# Altium PCB BYTE_SPIne.PcbDoc (part 3 of 3)
Units mm, origin at the board's own origin, x right, y up, seen from the top; angles counter-clockwise.
Board outline 108 x 73 mm, 4 copper layers (Top Layer, GND, PWR, Bottom Layer), stack 1.586 mm thick; 173 components, 126 nets, 724 pads, 308 vias.
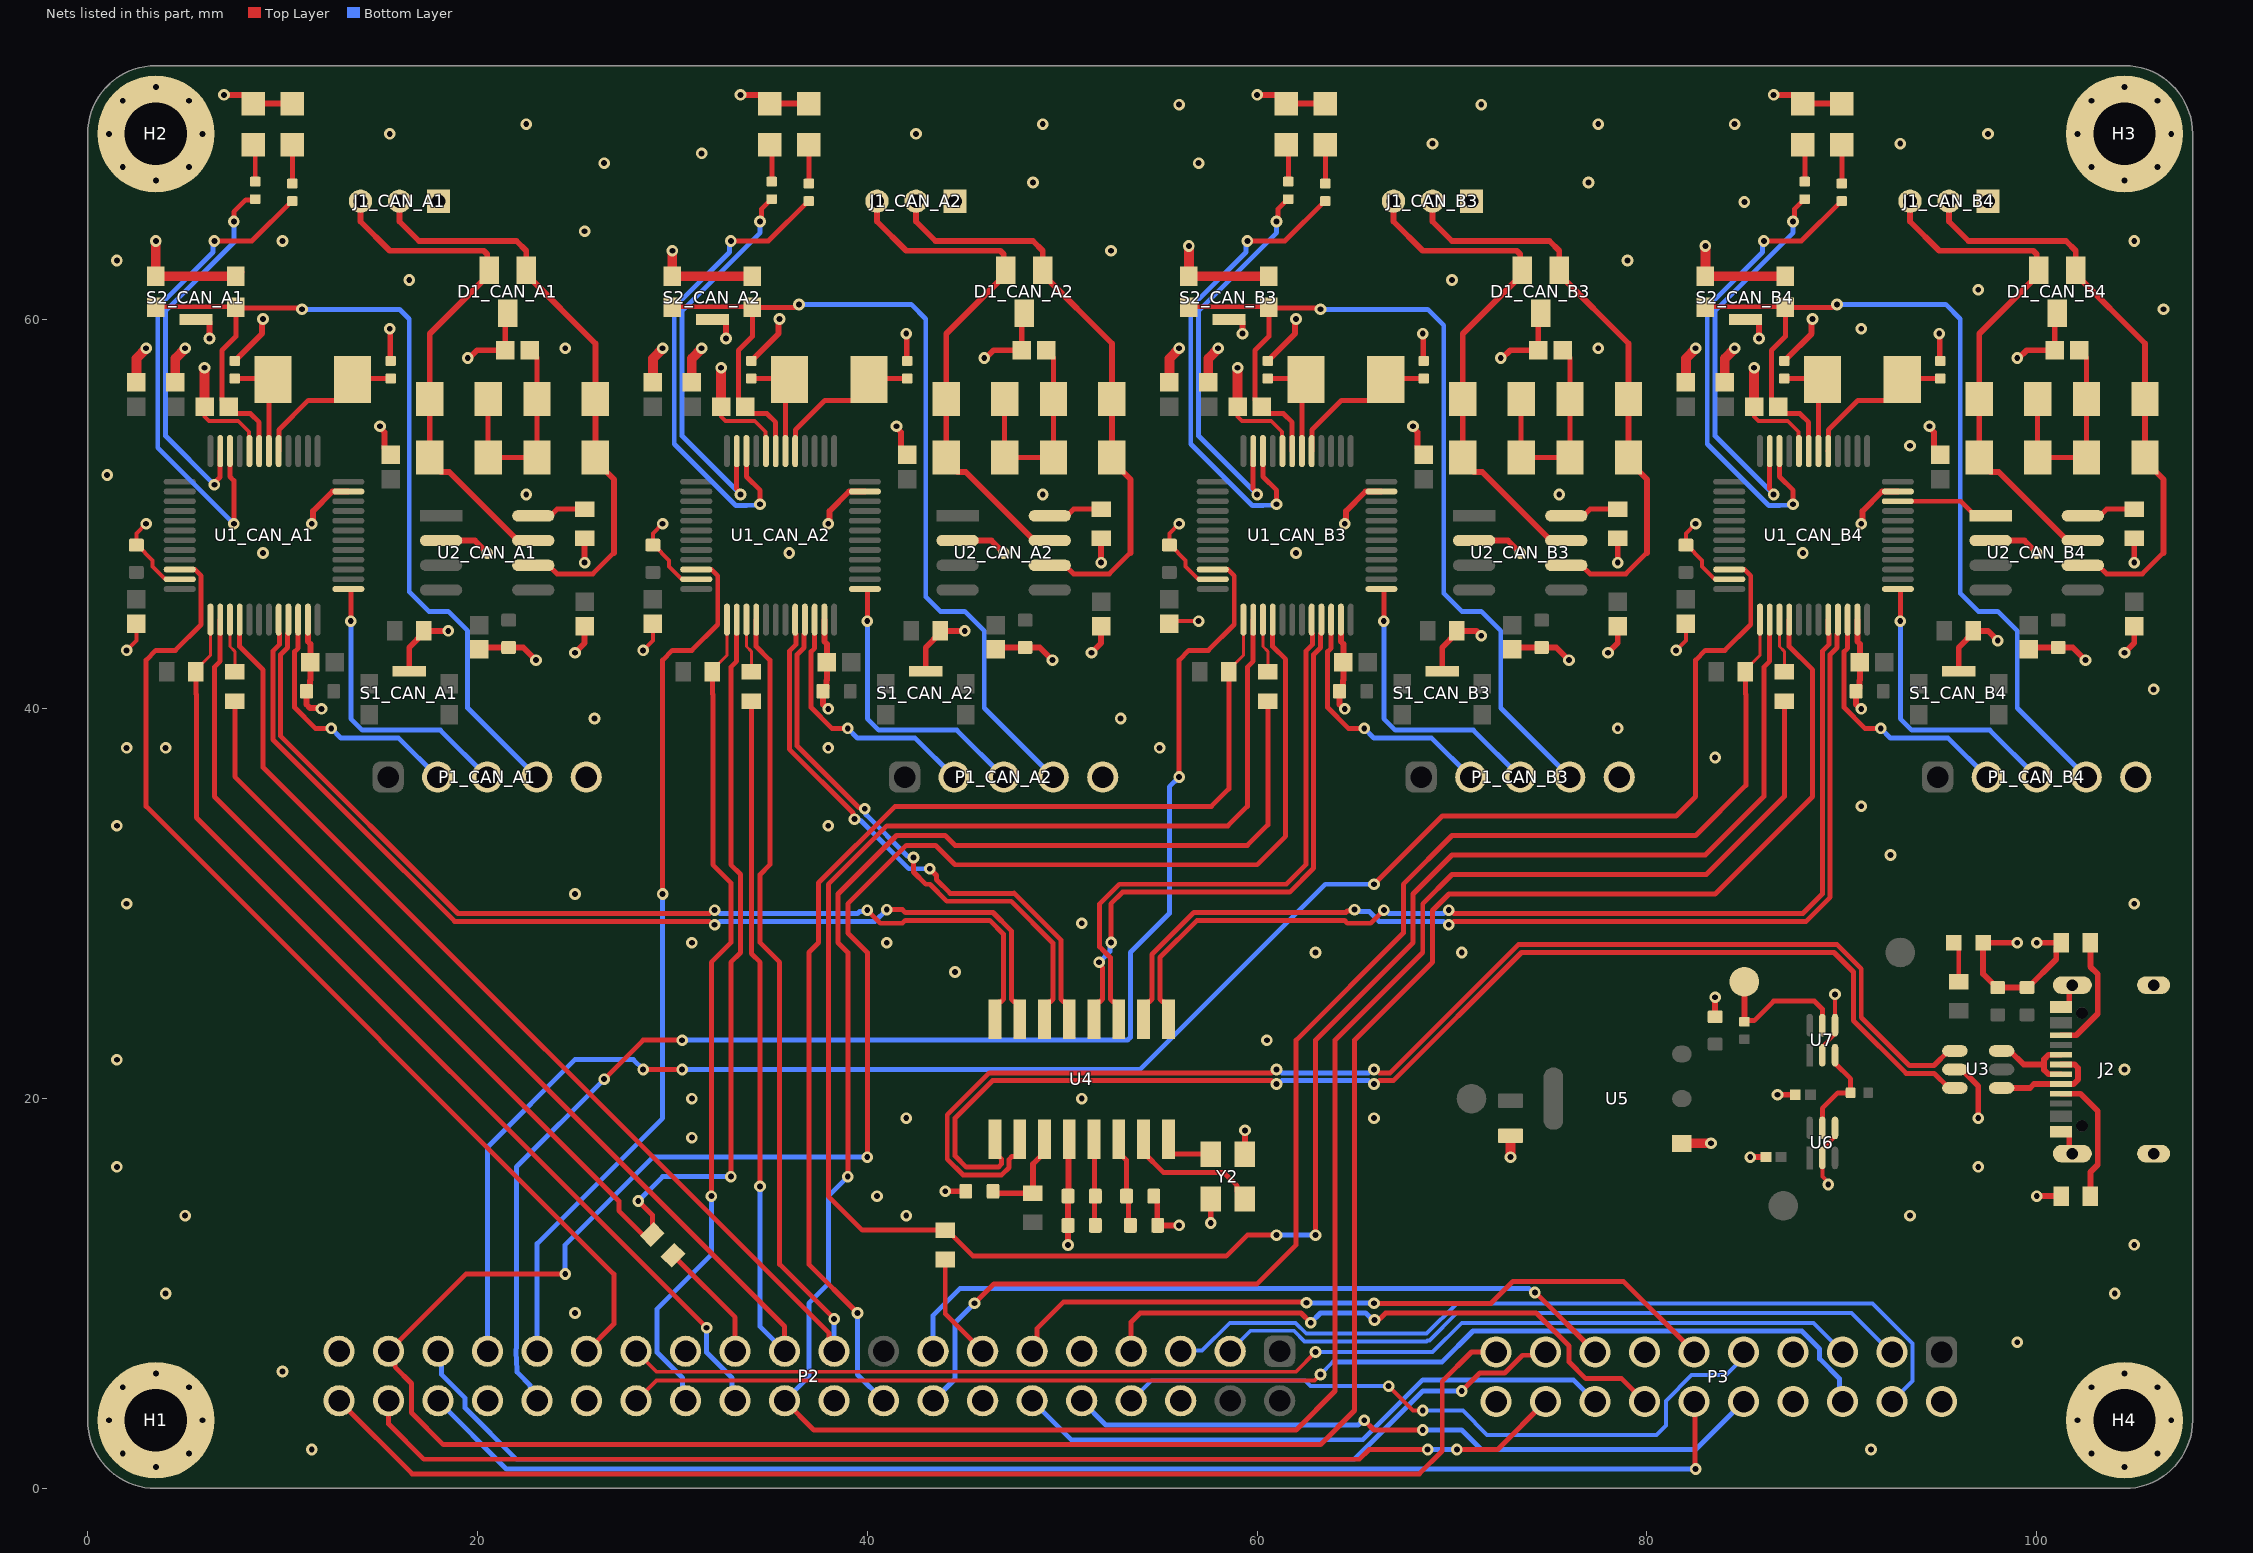
[diagram p4: the nets of this part, all layers, seen from the top]

## Via types
v1: diameter 0.6, hole 0.3, Top Layer to Bottom Layer, tented both sides, 308 vias

## Nets (pads, with @x,y where several pads share a name; then routed paths per layer and width w, separated by ;. In a path a pad name is that pad's centre, name@x,y a point inside that pad or via, vN(x,y) a via of type N, cw(c..) or ccw(c..) an arc to the next point about the centre after c; other vN are vias at no path point) (continued)
CAN_TX_CAN_B4: U1_CAN_B4.46 U2_CAN_B4.1 | length 5.1
  Top Layer w0.254: U1_CAN_B4.46@92.875,50.65 96.098,50.65 96.843,49.905 U2_CAN_B4.1@97.636,49.905
D+: J2.A6 J2.B6 U3.6 | length 4.9
  Top Layer w0.3: U3.6@98.2,22.45 98.631,22.45 99.331,21.75 100.38,21.75 ; J2.A6@101.25,21.25 100.606,21.25 100.38,21.476 100.38,21.75 ; J2.B6@101.25,22.25 100.606,22.25 100.38,22.024 100.38,21.75
D-: J2.A7 J2.B7 U3.4 | length 5.6
  Top Layer w0.3: U3.4@98.2,20.55 99.659,20.55 99.859,20.75 J2.B7@101.25,20.75 101.894,20.75 102.12,20.976 102.12,21.574 101.944,21.75 J2.A7@101.25,21.75
GND: C1_CAN_A1.2 C1_CAN_A2.2 C1_CAN_B3.2 C1_CAN_B4.2 C2_CAN_A1.2 C2_CAN_A2.2 C2_CAN_B3.2 C2_CAN_B4.2 C3_CAN_A1.2 C3_CAN_A2.2 C3_CAN_B3.2 C3_CAN_B4.2 C4_CAN_A1.2 C4_CAN_A2.2 C4_CAN_B3.2 C4_CAN_B4.2 C5_CAN_A1.2 C5_CAN_A2.2 C5_CAN_B3.2 C5_CAN_B4.2 C6_CAN_A1.2 C6_CAN_A2.2 C6_CAN_B3.2 C6_CAN_B4.2 C7_CAN_A1.1 C7_CAN_A2.1 C7_CAN_B3.1 C7_CAN_B4.1 C8_CAN_A1.1 C8_CAN_A2.1 C8_CAN_B3.1 C8_CAN_B4.1 C9.2 C10_CAN_A1.2 C10_CAN_A2.2 C10_CAN_B3.2 C10_CAN_B4.2 C11_CAN_A1.2 C11_CAN_A2.2 C11_CAN_B3.2 C11_CAN_B4.2 C12_CAN_A1.2 C12_CAN_A2.2 C12_CAN_B3.2 C12_CAN_B4.2 C13_CAN_A1.2 C13_CAN_A2.2 C13_CAN_B3.2 C13_CAN_B4.2 C14_CAN_A1.2 C14_CAN_A2.2 C14_CAN_B3.2 C14_CAN_B4.2 C15_CAN_A1.2 C15_CAN_A2.2 C15_CAN_B3.2 C15_CAN_B4.2 C16.2 C17.2 C18.2 C19.2 C20.1 C21.1 C22.2 C23.2 C24.1 C25.1 D1_CAN_A1.3 D1_CAN_A2.3 D1_CAN_B3.3 D1_CAN_B4.3 D2_CAN_A1.1 D2_CAN_A2.1 D2_CAN_B3.1 D2_CAN_B4.1 D3_CAN_A1.1 D3_CAN_A2.1 D3_CAN_B3.1 D3_CAN_B4.1 DS1.2 H1.1 H2.1 H3.1 H4.1 J1_CAN_A1.1 J1_CAN_A2.1 J1_CAN_B3.1 J1_CAN_B4.1 J2.A1_B12 J2.B1_A12 J2.S1 J2.S2 J2.S3 J2.S4 P1_CAN_A1.5 P1_CAN_A2.5 P1_CAN_B3.5 P1_CAN_B4.5 P2.6 P2.9 P2.14 P2.20 P2.25 P2.30 P2.34 P2.39 P3.2 P3.7 P3.8 P3.13 P3.20 R5_CAN_A1.1 R5_CAN_A2.1 R5_CAN_B3.1 R5_CAN_B4.1 R10_CAN_A1.2 R10_CAN_A2.2 R10_CAN_B3.2 R10_CAN_B4.2 R11.1 R12.2 S1_CAN_A1.5 S1_CAN_A2.5 S1_CAN_B3.5 S1_CAN_B4.5 S2_CAN_A1.2 S2_CAN_A1.3 S2_CAN_A1.5 S2_CAN_A2.2 S2_CAN_A2.3 S2_CAN_A2.5 S2_CAN_B3.2 S2_CAN_B3.3 S2_CAN_B3.5 S2_CAN_B4.2 S2_CAN_B4.3 S2_CAN_B4.5 U1_CAN_A1.8 U1_CAN_A1.23 U1_CAN_A1.35 U1_CAN_A1.47 U1_CAN_A2.8 U1_CAN_A2.23 U1_CAN_A2.35 U1_CAN_A2.47 U1_CAN_B3.8 U1_CAN_B3.23 U1_CAN_B3.35 U1_CAN_B3.47 U1_CAN_B4.8 U1_CAN_B4.23 U1_CAN_B4.35 U1_CAN_B4.47 U2_CAN_A1.2 U2_CAN_A2.2 U2_CAN_B3.2 U2_CAN_B4.2 U3.2 U4.12 U5.1 U6.2 U6.4 U7.2 U7.4 Y2.2 Y2.4 | length 270.2
  Top Layer w0.2: v1(2,43) 2.5,43.5 C14_CAN_A1.2@2.5,44.375 ; v1(3,49.5) 2.5,49 C13_CAN_A1.2@2.5,48.4 2.55,48.4 3.332,47.618 3.332,47.302 3.965,46.669 4.706,46.669 U1_CAN_A1.23@4.725,46.65 ; C4_CAN_A1.2@6,55.5 6,55 6.225,54.775 7.725,54.775 8.281,54.219 8.281,53.244 U1_CAN_A1.8@8.3,53.225 ; v1(28.5,43) 29,43.5 C14_CAN_A2.2@29,44.375 ; v1(29.5,49.5) 29,49 C13_CAN_A2.2@29,48.4 29.05,48.4 29.832,47.618 29.832,47.302 30.465,46.669 31.206,46.669 U1_CAN_A2.23@31.225,46.65 ; C4_CAN_A2.2@32.5,55.5 32.5,55 32.725,54.775 34.225,54.775 34.781,54.219 34.781,53.244 U1_CAN_A2.8@34.8,53.225 ; C14_CAN_B3.2@55.5,44.375 55.625,44.5 v1(57,44.5) ; v1(56,49.5) 55.5,49 C13_CAN_B3.2@55.5,48.4 55.55,48.4 56.332,47.618 56.332,47.302 56.965,46.669 57.706,46.669 U1_CAN_B3.23@57.725,46.65 ; C4_CAN_B3.2@59,55.5 59,55 59.225,54.775 60.725,54.775 61.281,54.219 61.281,53.244 U1_CAN_B3.8@61.3,53.225 ; v1(81.5,43) 82,43.5 C14_CAN_B4.2@82,44.375 ; v1(82.5,49.5) 82,49 C13_CAN_B4.2@82,48.4 82.05,48.4 82.832,47.618 82.832,47.302 83.465,46.669 84.206,46.669 U1_CAN_B4.23@84.225,46.65 ; C4_CAN_B4.2@85.5,55.5 85.5,55 85.725,54.775 87.225,54.775 87.781,54.219 87.781,53.244 U1_CAN_B4.8@87.8,53.225 ; U7.2@89,22.23 89,22.675 89.65,23.325 U7.4@89.65,23.77 v1(89.65,25.35) ; v1(89.3,15.6) 89.3,15.708 89,16.008 U6.2@89,16.96 89,17.405 89.65,18.055 U6.4@89.65,18.5
  Top Layer w0.3: S2_CAN_A1.5@5.55,59.975 6.125,59.975 6.25,59.85 v1(6.25,59) ; v1(7,71.5) 8.05,71.5 D3_CAN_A1.1@8.5,71.05 D2_CAN_A1.1@10.5,71.05 ; C8_CAN_A1.1@7.55,57.85 7.575,57.85 7.675,57.95 7.675,57.975 8.95,59.25 8.95,59.95 v1(9,60) ; U1_CAN_A1.35@11.3,44.575 11.3,43.45 11.425,43.325 C10_CAN_A1.2@11.425,42.4 11.425,41.475 11.405,41.455 11.405,41.08 C5_CAN_A1.2@11.225,40.9 11.225,40.225 11.401,40.049 11.951,40.049 v1(12,40) ; v1(11.5,49.5) 11.557,49.557 11.557,50.144 12.564,51.15 U1_CAN_A1.47@13.375,51.15 ; v1(15,54.5) 15,54.419 15.225,54.194 15.225,53.35 C15_CAN_A1.2@15.55,53.025 ; v1(15.5,59.5) 15.525,59.475 15.525,57.875 C7_CAN_A1.1@15.55,57.85 ; S1_CAN_A1.5@16.5,41.925 16.5,43.15 17.25,43.9 R10_CAN_A1.2@17.25,44 v1(18.5,44) ; U2_CAN_A1.2@18.136,48.635 19.865,48.635 v1(20.5,48) ; v1(19.5,58) 19.581,58 19.981,58.4 C3_CAN_A1.2@21.425,58.4 21.425,60.175 D1_CAN_A1.3@21.55,60.3 ; C2_CAN_A1.2@20.1,43.05 20.2,43.15 C1_CAN_A1.2@21.6,43.15 22.35,43.15 v1(23,42.5) ; v1(25,42.875) 25.5,43.375 C6_CAN_A1.2@25.5,44.25 ; v1(25.5,47.5) R5_CAN_A1.1@25.5,48.75 ; S2_CAN_A2.5@32.05,59.975 32.625,59.975 32.75,59.85 v1(32.75,59) ; v1(33.5,71.5) 34.55,71.5 D3_CAN_A2.1@35,71.05 D2_CAN_A2.1@37,71.05 ; C8_CAN_A2.1@34.05,57.85 34.075,57.85 34.175,57.95 34.175,57.975 35.45,59.25 35.45,59.95 v1(35.5,60) ; U1_CAN_A2.35@37.8,44.575 37.8,43.45 37.925,43.325 C10_CAN_A2.2@37.925,42.4 37.925,41.475 37.905,41.455 37.905,41.08 C5_CAN_A2.2@37.725,40.9 37.725,40.225 37.95,40 v1(38,40) ; v1(38,49.5) 38.057,49.557 38.057,50.144 39.064,51.15 U1_CAN_A2.47@39.875,51.15 ; v1(41.5,54.5) 41.5,54.419 41.725,54.194 41.725,53.35 C15_CAN_A2.2@42.05,53.025 ; v1(42,59.25) 42.025,59.225 42.025,57.875 C7_CAN_A2.1@42.05,57.85 ; S1_CAN_A2.5@43,41.925 43,43.15 43.75,43.9 R10_CAN_A2.2@43.75,44 v1(45,44) ; v1(44,15.25) C19.2@45.05,15.25 ; U2_CAN_A2.2@44.636,48.635 46.365,48.635 v1(47,48) ; v1(46,58) 46.081,58 46.481,58.4 C3_CAN_A2.2@47.925,58.4 47.925,60.175 D1_CAN_A2.3@48.05,60.3 ; C2_CAN_A2.2@46.6,43.05 46.7,43.15 C1_CAN_A2.2@48.1,43.15 48.85,43.15 v1(49.5,42.5) ; v1(50.3,12.494) C18.2@50.3,13.5 C17.2@50.3,15 50.333,15.032 50.333,17.894 U4.12@50.365,17.927 ; v1(51.5,42.875) 52,43.375 C6_CAN_A2.2@52,44.25 ; v1(52,47.5) R5_CAN_A2.1@52,48.75 ; C16.2@54.7,15 54.88,14.82 54.88,13.52 C9.2@54.9,13.5 v1(56,13.5) ; v1(57.625,13.625) Y2.2@57.625,14.85 ; S2_CAN_B3.5@58.55,59.975 59.125,59.975 59.25,59.85 v1(59.25,59.25) ; Y2.4@59.375,17.15 v1(59.375,18.375) ; v1(60,71.5) 61.05,71.5 D3_CAN_B3.1@61.5,71.05 D2_CAN_B3.1@63.5,71.05 ; C8_CAN_B3.1@60.55,57.85 60.575,57.85 60.675,57.95 60.675,57.975 61.95,59.25 61.95,59.95 v1(62,60) ; U1_CAN_B3.35@64.3,44.575 64.3,43.45 64.425,43.325 C10_CAN_B3.2@64.425,42.4 64.425,41.475 64.405,41.455 64.405,41.08 C5_CAN_B3.2@64.225,40.9 64.225,40.225 64.45,40 v1(64.5,40) ; v1(64.5,49.5) 64.557,49.557 64.557,50.144 65.564,51.15 U1_CAN_B3.47@66.375,51.15 ; v1(68,54.5) 68,54.419 68.225,54.194 68.225,53.35 C15_CAN_B3.2@68.55,53.025 ; v1(68.5,59.25) 68.525,59.225 68.525,57.875 C7_CAN_B3.1@68.55,57.85 ; S1_CAN_B3.5@69.5,41.925 69.5,43.15 R10_CAN_B3.2@70.25,43.9 ; R10_CAN_B3.2@70.25,44 71.25,44 v1(71.5,43.75) ; U2_CAN_B3.2@71.136,48.635 72.865,48.635 v1(73.5,48) ; v1(72.5,58) 72.581,58 72.981,58.4 C3_CAN_B3.2@74.425,58.4 74.425,60.175 D1_CAN_B3.3@74.55,60.3 ; C2_CAN_B3.2@73.1,43.05 73.2,43.15 C1_CAN_B3.2@74.6,43.15 75.35,43.15 v1(76,42.5) ; v1(78,42.875) 78.5,43.375 C6_CAN_B3.2@78.5,44.25 ; v1(78.5,47.5) R5_CAN_B3.1@78.5,48.75 ; C20.1@83.5,24.2 v1(83.5,25.2) ; S2_CAN_B4.5@85.05,59.975 85.625,59.975 85.75,59.85 v1(85.75,59) ; v1(85.3,17) C24.1@86.11,17 ; v1(86.5,71.5) 87.55,71.5 D3_CAN_B4.1@88,71.05 D2_CAN_B4.1@90,71.05 ; v1(86.7,20.2) C25.1@87.61,20.2 ; C8_CAN_B4.1@87.05,57.85 87.075,57.85 87.175,57.95 87.175,57.975 88.45,59.25 88.45,59.95 v1(88.5,60) ; U1_CAN_B4.35@90.8,44.575 90.8,43.45 90.925,43.325 C10_CAN_B4.2@90.925,42.4 90.925,41.475 90.905,41.455 90.905,41.08 C5_CAN_B4.2@90.725,40.9 90.725,40.225 90.95,40 v1(91,40) ; v1(91,49.5) 91.057,49.557 91.057,50.144 92.064,51.15 U1_CAN_B4.47@92.875,51.15 ; v1(94.5,54.5) 94.5,54.419 94.725,54.194 94.725,53.35 C15_CAN_B4.2@95.05,53.025 ; v1(95,59.25) 95.025,59.225 95.025,57.875 C7_CAN_B4.1@95.05,57.85 ; U3.2@95.8,21.5 96.15,21.5 97,20.65 v1(97,19) ; S1_CAN_B4.5@96,41.925 96,43.15 96.75,43.9 R10_CAN_B4.2@96.75,44 97.5,44 v1(98,43.5) ; U2_CAN_B4.2@97.636,48.635 99.365,48.635 v1(100,48) ; v1(99,28) DS1.2@97.25,28 97.25,26.4 97.95,25.7 C22.2@98,25.7 C23.2@99.5,25.7 99.55,25.7 101,27.15 101,27.75 R12.2@101.25,28 v1(100,28) ; v1(99,58) 99.081,58 99.481,58.4 C3_CAN_B4.2@100.925,58.4 100.925,60.175 D1_CAN_B4.3@101.05,60.3 ; C2_CAN_B4.2@99.6,43.05 99.7,43.15 C1_CAN_B4.2@101.1,43.15 101.85,43.15 v1(102.5,42.5) ; v1(100,15) R11.1@101.25,15 ; J2.A1_B12@101.25,18.3 101.52,18.3 101.67,18.15 101.67,17.335 J2.S1@101.83,17.175 ; J2.B1_A12@101.25,24.7 101.52,24.7 101.67,24.85 101.67,25.665 J2.S2@101.83,25.825 ; v1(104.5,42.875) 105,43.375 C6_CAN_B4.2@105,44.25 ; v1(105,47.5) R5_CAN_B4.1@105,48.75
  Top Layer w0.5: C12_CAN_A1.2@2.5,56.75 2.5,57.975 3,58.475 v1(3,58.5) ; v1(3.5,64) S2_CAN_A1.3@3.5,62.2 S2_CAN_A1.2@7.6,62.2 7.6,62.205 S2_CAN_A1.2@7.8,62.405 ; C11_CAN_A1.2@4.5,56.75 4.5,57.975 5,58.475 v1(5,58.5) ; C4_CAN_A1.2@6,55.5 v1(6,57.5) ; C12_CAN_A2.2@29,56.75 29,57.975 29.5,58.475 v1(29.5,58.5) ; v1(30,63.5) S2_CAN_A2.3@30,62.2 S2_CAN_A2.2@34.1,62.2 ; C11_CAN_A2.2@31,56.75 31,57.975 31.5,58.475 v1(31.5,58.5) ; C4_CAN_A2.2@32.5,55.5 v1(32.5,57.5) ; C12_CAN_B3.2@55.5,56.75 55.5,57.975 56,58.475 v1(56,58.5) ; v1(56.5,63.75) S2_CAN_B3.3@56.5,62.2 S2_CAN_B3.2@60.6,62.2 ; C11_CAN_B3.2@57.5,56.75 57.5,57.975 58,58.475 v1(58,58.5) ; C4_CAN_B3.2@59,55.5 v1(59,57.5) ; v1(73,17) C21.1@73,18.1 ; U5.1@81.795,17.71 v1(83.29,17.71) ; C12_CAN_B4.2@82,56.75 82,57.975 82.5,58.475 v1(82.5,58.5) ; v1(83,63.75) S2_CAN_B4.3@83,62.2 S2_CAN_B4.2@87.1,62.2 ; C11_CAN_B4.2@84,56.75 84,57.975 84.5,58.475 v1(84.5,58.5) ; C4_CAN_B4.2@85.5,55.5 v1(85.5,57.5)
  other v1: 11.5,2 91.5,2 10,6 99,7.5 25,9 4,10 104,10 105,12.5 5,14 42,14 93.5,14 40.5,15 1.5,16.5 97,16.5 31,18 42,19 66,19 31,20 51,20 104.5,21.5 1.5,22 60.5,23 44.5,26.5 63,27.5 70.5,27.5 31,28 41,28 51,29 2,30 105,30 25,30.5 92.5,32.5 1.5,34 38,34 91,35 83.5,37.5 2,38 4,38 38,38 55,38 78.5,39 26,39.5 53,39.5 106,41 9,48 36,48 62,48 88,48 22.5,51 49,51 75.5,51 1,52 93.5,53.5 24.5,58.5 77.5,58.5 91,59.5 106.5,60.5 97,61.5 16.5,62 70,62 1.5,63 79,63 52.5,63.5 10,64 105,64 25.5,64.5 85,66 48.5,67 77,67 26.5,68 57,68 31.5,68.5 69,69 93,69 15.5,69.5 42.5,69.5 97.5,69.5 22.5,70 49,70 77.5,70 84.5,70 56,71 71.5,71
GPIO9: P2.7 P3.14 | length 31.1
  Top Layer w0.254: P2.7@53.54,7.04 53.54,8.54 54,9 62.25,9 v1(62.75,8.5) ; v1(66.025,8.641) 66.092,8.707 66.305,8.707 66.597,9 74.323,9 76,7.323 76,6.5 76.864,5.636 78.704,5.636 P3.14@79.88,4.46
  Bottom Layer w0.254: v1(62.75,8.5) 63.25,9 65.573,9 65.932,8.641 v1(66.025,8.641)
GPIO12/PWM: P2.15 P3.15 | length 37.7
  Top Layer w0.254: v1(74.25,10.05) 74.29,10.05 P3.15@77.34,7
  Bottom Layer w0.254: P2.15@43.38,7.04 43.38,8.88 44.75,10.25 73.956,10.25 74.156,10.05 v1(74.25,10.05)
I2C0_SCL: P2.28 P3.6 | length 65.8
  Top Layer w0.2: P2.28@28.14,4.5 29.19,5.55 62.95,5.55 v1(63.25,5.85)
  Bottom Layer w0.2: v1(63.25,5.85) 63.9,6.5
  Bottom Layer w0.254: 63.9,6.5 69.5,6.5 71.077,8.077 87.946,8.077 88.864,7.159 88.864,6.653 89.876,5.641 89.876,4.624 P3.6@90.04,4.46
I2C0_SDA: P2.27 P3.5 | length 64
  Top Layer w0.2: P2.27@28.14,7.04 29.19,5.99 61.99,5.99 v1(63,7)
  Bottom Layer w0.2: v1(63,7) 69,7 70.5,8.5 88.54,8.5 P3.5@90.04,7
I2C1_SCL: P2.5 P3.4 | length 43.3
  Bottom Layer w0.2: P2.5@56.08,7.04 56.125,7.085 57.18,7.085 58.595,8.5 61.972,8.5 62.522,7.95 68.7,7.95 70.25,9.5 91.565,9.5 93.63,7.435 93.63,5.51 P3.4@92.58,4.46
I2C1_SDA: P2.3 P3.3 | length 36
  Bottom Layer w0.2: P2.3@58.62,7.04 59.67,8.09 61.887,8.09 62.427,7.55 68.7,7.55 68.75,7.6 68.845,7.6 70.245,9 90.5,9 92.5,7 P3.3@92.58,7
I2S0_DIN: P2.38 P3.18 | length 62.5
  Top Layer w0.254: P2.38@15.44,4.5 15.44,3.31 17.25,1.5 65.25,1.5 65.75,2 v1(68.75,2) ; v1(70.25,2) 72.34,2 P3.18@74.8,4.46
  Bottom Layer w0.254: v1(68.75,2) v1(70.25,2)
I2S0_DOUT: P2.40 P3.19 | length 65.7
  Top Layer w0.254: P2.40@12.9,4.5 12.9,4.35 13.05,4.35 16.65,0.75 68.327,0.75 69.5,1.923 69.5,5.5 71,7 P3.19@72.26,7
I2S0_FS: P2.35 P3.17 | length 62.3
  Top Layer w0.254: v1(70.5,5) 71.423,5.923 72.706,5.923 73.619,6.836 74.636,6.836 P3.17@74.8,7
  Bottom Layer w0.254: P2.35@17.98,7.04 18.144,6.876 18.144,5.859 19.367,4.636 19.367,4.13 21.997,1.5 65,1.5 68.5,5 v1(70.5,5)
I2S0_SCLK: P2.12 P3.16 | length 31.4
  Bottom Layer w0.254: P2.12@48.46,4.5 50.46,2.5 65.429,2.5 68.506,5.577 76.223,5.577 P3.16@77.34,4.46
NetC3_CAN_A1_1: C3_CAN_A1.1 R6_CAN_A1.1 R7_CAN_A1.1 R15_CAN_A1.2 R16_CAN_A1.2 | length 11.2
  Top Layer w0.254: R6_CAN_A1.1@20.55,55.9 R7_CAN_A1.1@20.55,52.9 R16_CAN_A1.2@23.05,52.9 R15_CAN_A1.2@23.05,55.9 23.05,58.025 C3_CAN_A1.1@22.675,58.4
NetC3_CAN_A2_1: C3_CAN_A2.1 R6_CAN_A2.1 R7_CAN_A2.1 R15_CAN_A2.2 R16_CAN_A2.2 | length 11.2
  Top Layer w0.254: R6_CAN_A2.1@47.05,55.9 R7_CAN_A2.1@47.05,52.9 R16_CAN_A2.2@49.55,52.9 R15_CAN_A2.2@49.55,55.9 49.55,58.025 C3_CAN_A2.1@49.175,58.4
NetC3_CAN_B3_1: C3_CAN_B3.1 R6_CAN_B3.1 R7_CAN_B3.1 R15_CAN_B3.2 R16_CAN_B3.2 | length 11.2
  Top Layer w0.254: R6_CAN_B3.1@73.55,55.9 R7_CAN_B3.1@73.55,52.9 R16_CAN_B3.2@76.05,52.9 R15_CAN_B3.2@76.05,55.9 76.05,58.025 C3_CAN_B3.1@75.675,58.4
NetC3_CAN_B4_1: C3_CAN_B4.1 R6_CAN_B4.1 R7_CAN_B4.1 R15_CAN_B4.2 R16_CAN_B4.2 | length 11.2
  Top Layer w0.254: R6_CAN_B4.1@100.05,55.9 R7_CAN_B4.1@100.05,52.9 R16_CAN_B4.2@102.55,52.9 R15_CAN_B4.2@102.55,55.9 102.55,58.025 C3_CAN_B4.1@102.175,58.4
NetC7_CAN_A1_2: C7_CAN_A1.2 U1_CAN_A1.5 Y1_CAN_A1.1 | length 8.1
  Top Layer w0.254: U1_CAN_A1.5@9.8,53.225 9.809,53.234 9.809,54.309 11.327,55.827 12.777,55.827 13.6,56.65 Y1_CAN_A1.1@13.6,56.9 13.65,56.95 C7_CAN_A1.2@15.55,56.95
NetC7_CAN_A2_2: C7_CAN_A2.2 U1_CAN_A2.5 Y1_CAN_A2.1 | length 8.1
  Top Layer w0.254: U1_CAN_A2.5@36.3,53.225 36.309,53.234 36.309,54.309 37.827,55.827 39.277,55.827 40.1,56.65 Y1_CAN_A2.1@40.1,56.9 40.15,56.95 C7_CAN_A2.2@42.05,56.95
NetC7_CAN_B3_2: C7_CAN_B3.2 U1_CAN_B3.5 Y1_CAN_B3.1 | length 8.1
  Top Layer w0.254: U1_CAN_B3.5@62.8,53.225 62.809,53.234 62.809,54.309 64.327,55.827 65.777,55.827 66.6,56.65 Y1_CAN_B3.1@66.6,56.9 66.65,56.95 C7_CAN_B3.2@68.55,56.95
NetC7_CAN_B4_2: C7_CAN_B4.2 U1_CAN_B4.5 Y1_CAN_B4.1 | length 8.1
  Top Layer w0.254: U1_CAN_B4.5@89.3,53.225 89.309,53.234 89.309,54.309 90.827,55.827 92.277,55.827 93.1,56.65 Y1_CAN_B4.1@93.1,56.9 93.15,56.95 C7_CAN_B4.2@95.05,56.95
NetC8_CAN_A1_2: C8_CAN_A1.2 U1_CAN_A1.6 Y1_CAN_A1.2 | length 5.7
  Top Layer w0.254: C8_CAN_A1.2@7.55,56.95 9.45,56.95 Y1_CAN_A1.2@9.5,56.9 9.3,56.7 U1_CAN_A1.6@9.3,53.225
NetC8_CAN_A2_2: C8_CAN_A2.2 U1_CAN_A2.6 Y1_CAN_A2.2 | length 5.7
  Top Layer w0.254: C8_CAN_A2.2@34.05,56.95 35.95,56.95 Y1_CAN_A2.2@36,56.9 35.8,56.7 U1_CAN_A2.6@35.8,53.225
NetC8_CAN_B3_2: C8_CAN_B3.2 U1_CAN_B3.6 Y1_CAN_B3.2 | length 5.7
  Top Layer w0.254: C8_CAN_B3.2@60.55,56.95 62.45,56.95 Y1_CAN_B3.2@62.5,56.9 62.3,56.7 U1_CAN_B3.6@62.3,53.225
NetC8_CAN_B4_2: C8_CAN_B4.2 U1_CAN_B4.6 Y1_CAN_B4.2 | length 5.7
  Top Layer w0.254: C8_CAN_B4.2@87.05,56.95 88.95,56.95 Y1_CAN_B4.2@89,56.9 88.8,56.7 U1_CAN_B4.6@88.8,53.225
NetC9_1: C9.1 C16.1 U4.14 | length 4.7
  Top Layer w0.254: U4.14@52.905,17.927 52.905,17.241 53.3,16.846 C16.1@53.3,15 53.4,14.9 53.4,13.6 C9.1@53.5,13.5
NetC17_1: C17.1 C18.1 U4.13 | length 4.5
  Top Layer w0.254: U4.13@51.635,17.927 51.668,17.894 51.668,13.532 C18.1@51.7,13.5
NetC19_1: C19.1 R8.1 U4.11 | length 5
  Top Layer w0.3: C19.1@46.518,15.15 R8.1@48.5,15.15 48.5,16.646 49.095,17.241 U4.11@49.095,17.927
NetD1_CAN_A1_1: D1_CAN_A1.1 J1_CAN_A1.2 R15_CAN_A1.1 R16_CAN_A1.1 U2_CAN_A1.6 | length 30.3
  Top Layer w0.254: U2_CAN_A1.6@22.864,47.365 23.635,47.365 24.077,46.923 25.923,46.923 27,48 ; R16_CAN_A1.1@26.05,52.725 R16_CAN_A1.1@26.05,52.9
  Top Layer w0.3: J1_CAN_A1.2@16,66.05 16,65 17,64 22,64 22.5,63.5 D1_CAN_A1.1@22.5,62.5 ; D1_CAN_A1.1@22.5,62.5 22.5,62.3 26.05,58.75 R15_CAN_A1.1@26.05,55.9 R16_CAN_A1.1@26.05,52.9 ; R16_CAN_A1.1@26.05,52.725 27,51.775 27,48
NetD1_CAN_A1_2: D1_CAN_A1.2 J1_CAN_A1.3 R6_CAN_A1.2 R7_CAN_A1.2 U2_CAN_A1.7 | length 27.2
  Top Layer w0.254: R7_CAN_A1.2@17.55,52.9 17.55,52.725 R7_CAN_A1.2@18.123,52.152 ; U2_CAN_A1.7@22.07,48.635 U2_CAN_A1.7@22.864,48.635
  Top Layer w0.3: J1_CAN_A1.3@14,66.05 14,65 15.5,63.5 20.324,63.5 20.5,63.324 20.5,62.6 D1_CAN_A1.2@20.6,62.5 20.6,62.3 17.55,59.25 R6_CAN_A1.2@17.55,55.9 R7_CAN_A1.2@17.55,52.9 ; R7_CAN_A1.2@18.123,52.152 18.553,52.152 U2_CAN_A1.7@22.07,48.635
NetD1_CAN_A2_1: D1_CAN_A2.1 J1_CAN_A2.2 R15_CAN_A2.1 R16_CAN_A2.1 U2_CAN_A2.6 | length 30.3
  Top Layer w0.254: U2_CAN_A2.6@49.364,47.365 50.135,47.365 50.577,46.923 52.423,46.923 53.5,48 ; R16_CAN_A2.1@52.55,52.725 R16_CAN_A2.1@52.55,52.9
  Top Layer w0.3: J1_CAN_A2.2@42.5,66.05 42.5,65 43.5,64 48.5,64 49,63.5 D1_CAN_A2.1@49,62.5 ; D1_CAN_A2.1@49,62.5 49,62.3 52.55,58.75 R15_CAN_A2.1@52.55,55.9 R16_CAN_A2.1@52.55,52.9 ; R16_CAN_A2.1@52.55,52.725 53.5,51.775 53.5,48
NetD1_CAN_A2_2: D1_CAN_A2.2 J1_CAN_A2.3 R6_CAN_A2.2 R7_CAN_A2.2 U2_CAN_A2.7 | length 27.2
  Top Layer w0.254: R7_CAN_A2.2@44.05,52.9 44.05,52.725 R7_CAN_A2.2@44.623,52.152 ; U2_CAN_A2.7@48.57,48.635 U2_CAN_A2.7@49.364,48.635
  Top Layer w0.3: J1_CAN_A2.3@40.5,66.05 40.5,65 42,63.5 46.824,63.5 47,63.324 47,62.6 D1_CAN_A2.2@47.1,62.5 47.1,62.3 44.05,59.25 R6_CAN_A2.2@44.05,55.9 R7_CAN_A2.2@44.05,52.9 ; R7_CAN_A2.2@44.623,52.152 45.053,52.152 U2_CAN_A2.7@48.57,48.635
NetD1_CAN_B3_1: D1_CAN_B3.1 J1_CAN_B3.2 R15_CAN_B3.1 R16_CAN_B3.1 U2_CAN_B3.6 | length 30.3
  Top Layer w0.254: U2_CAN_B3.6@75.864,47.365 76.635,47.365 77.077,46.923 78.923,46.923 80,48 ; R16_CAN_B3.1@79.05,52.725 R16_CAN_B3.1@79.05,52.9
  Top Layer w0.3: J1_CAN_B3.2@69,66.05 69,65 70,64 75,64 75.5,63.5 D1_CAN_B3.1@75.5,62.5 ; D1_CAN_B3.1@75.5,62.5 75.5,62.3 79.05,58.75 R15_CAN_B3.1@79.05,55.9 R16_CAN_B3.1@79.05,52.9 ; R16_CAN_B3.1@79.05,52.725 80,51.775 80,48
NetD1_CAN_B3_2: D1_CAN_B3.2 J1_CAN_B3.3 R6_CAN_B3.2 R7_CAN_B3.2 U2_CAN_B3.7 | length 27.2
  Top Layer w0.254: R7_CAN_B3.2@70.55,52.9 70.55,52.725 R7_CAN_B3.2@71.123,52.152 ; U2_CAN_B3.7@75.07,48.635 U2_CAN_B3.7@75.864,48.635
  Top Layer w0.3: J1_CAN_B3.3@67,66.05 67,65 68.5,63.5 73.324,63.5 73.5,63.324 73.5,62.6 D1_CAN_B3.2@73.6,62.5 73.6,62.3 70.55,59.25 R6_CAN_B3.2@70.55,55.9 R7_CAN_B3.2@70.55,52.9 ; R7_CAN_B3.2@71.123,52.152 71.553,52.152 U2_CAN_B3.7@75.07,48.635
NetD1_CAN_B4_1: D1_CAN_B4.1 J1_CAN_B4.2 R15_CAN_B4.1 R16_CAN_B4.1 U2_CAN_B4.6 | length 30.3
  Top Layer w0.254: U2_CAN_B4.6@102.364,47.365 103.135,47.365 103.577,46.923 105.423,46.923 106.5,48 ; R16_CAN_B4.1@105.55,52.725 R16_CAN_B4.1@105.55,52.9
  Top Layer w0.3: J1_CAN_B4.2@95.5,66.05 95.5,65 96.5,64 101.5,64 102,63.5 D1_CAN_B4.1@102,62.5 ; D1_CAN_B4.1@102,62.5 102,62.3 105.55,58.75 R15_CAN_B4.1@105.55,55.9 R16_CAN_B4.1@105.55,52.9 ; R16_CAN_B4.1@105.55,52.725 106.5,51.775 106.5,48
NetD1_CAN_B4_2: D1_CAN_B4.2 J1_CAN_B4.3 R6_CAN_B4.2 R7_CAN_B4.2 U2_CAN_B4.7 | length 27.2
  Top Layer w0.254: R7_CAN_B4.2@97.05,52.9 97.05,52.725 R7_CAN_B4.2@97.623,52.152 ; U2_CAN_B4.7@101.57,48.635 U2_CAN_B4.7@102.364,48.635
  Top Layer w0.3: J1_CAN_B4.3@93.5,66.05 93.5,65 95,63.5 99.824,63.5 100,63.324 100,62.6 D1_CAN_B4.2@100.1,62.5 100.1,62.3 97.05,59.25 R6_CAN_B4.2@97.05,55.9 R7_CAN_B4.2@97.05,52.9 ; R7_CAN_B4.2@97.623,52.152 98.053,52.152 U2_CAN_B4.7@101.57,48.635
NetD2_CAN_A1_2: D2_CAN_A1.2 R1_CAN_A1.1 | length 2
  Top Layer w0.254: R1_CAN_A1.1@10.5,66.95 D2_CAN_A1.2@10.5,68.9
NetD2_CAN_A2_2: D2_CAN_A2.2 R1_CAN_A2.1 | length 2
  Top Layer w0.254: R1_CAN_A2.1@37,66.95 D2_CAN_A2.2@37,68.9
NetD2_CAN_B3_2: D2_CAN_B3.2 R1_CAN_B3.1 | length 2
  Top Layer w0.254: R1_CAN_B3.1@63.5,66.95 D2_CAN_B3.2@63.5,68.9
NetD2_CAN_B4_2: D2_CAN_B4.2 R1_CAN_B4.1 | length 2
  Top Layer w0.254: R1_CAN_B4.1@90,66.95 D2_CAN_B4.2@90,68.9
NetD3_CAN_A1_2: D3_CAN_A1.2 R2_CAN_A1.1 | length 1.8
  Top Layer w0.254: R2_CAN_A1.1@8.6,67.05 D3_CAN_A1.2@8.6,68.85
NetD3_CAN_A2_2: D3_CAN_A2.2 R2_CAN_A2.1 | length 1.8
  Top Layer w0.254: R2_CAN_A2.1@35.1,67.05 D3_CAN_A2.2@35.1,68.85
NetD3_CAN_B3_2: D3_CAN_B3.2 R2_CAN_B3.1 | length 1.8
  Top Layer w0.254: R2_CAN_B3.1@61.6,67.05 D3_CAN_B3.2@61.6,68.85
NetD3_CAN_B4_2: D3_CAN_B4.2 R2_CAN_B4.1 | length 1.8
  Top Layer w0.254: R2_CAN_B4.1@88.1,67.05 D3_CAN_B4.2@88.1,68.85
NetDS1_1: DS1.1 R13.1 | length 2.1
  Top Layer w0.254: DS1.1@95.75,28 96,27.75 R13.1@96,26
NetJ2_A5: J2.A5 R11.2 | length 6.8
  Top Layer w0.3: J2.A5@101.25,20.25 102.25,20.25 103.13,19.37 103.13,16.608 102.75,16.228 R11.2@102.75,15
NetJ2_B5: J2.B5 R12.1 | length 6.1
  Top Layer w0.3: J2.B5@101.25,23.25 102.029,23.25 103.13,24.351 103.13,26.392 102.75,26.772 R12.1@102.75,28
NetP2_13: P2.13 R17.2 | length 5.5
  Top Layer w0.254: R17.2@44,11.75 44,8.96 P2.13@45.92,7.04
NetP2_23: P2.23 R18.2 | length 5.9
  Top Layer w0.254: R18.2@30.28,11.72 33.22,8.78 P2.23@33.22,7.04
NetR1_CAN_A1_2: R1_CAN_A1.2 U1_CAN_A1.10 | length 26
  Top Layer w0.254: v1(6.5,64) 8.425,64 10.475,66.05 R1_CAN_A1.2@10.5,66.05 ; U1_CAN_A1.10@7.3,53.225 7.3,51.911 7.5,51.711 v1(7.5,49.5)
  Bottom Layer w0.254: v1(6.5,64) 6.434,63.934 6.434,63.434 3.596,60.596 3.596,53.404 v1(7.5,49.5)
NetR1_CAN_A2_2: R1_CAN_A2.2 U1_CAN_A2.10 | length 25.2
  Top Layer w0.254: v1(33,64) 34.925,64 36.975,66.05 R1_CAN_A2.2@37,66.05 ; U1_CAN_A2.10@33.8,53.225 33.8,51.911 34.5,51.211 v1(34.5,50.5)
  Bottom Layer w0.254: v1(33,64) 32.934,63.934 32.934,63.434 30.096,60.596 30.096,53.588 33.261,50.423 33.795,50.423 33.819,50.447 34.447,50.447 v1(34.5,50.5)
NetR1_CAN_B3_2: R1_CAN_B3.2 U1_CAN_B3.10 | length 25.2
  Top Layer w0.254: v1(59.5,64) 61.425,64 63.475,66.05 R1_CAN_B3.2@63.5,66.05 ; U1_CAN_B3.10@60.3,53.225 60.3,51.911 61,51.211 v1(61,50.5)
  Bottom Layer w0.254: v1(59.5,64) 59.434,63.934 59.434,63.434 56.596,60.596 56.596,53.588 59.761,50.423 60.295,50.423 60.319,50.447 60.947,50.447 v1(61,50.5)
NetR1_CAN_B4_2: R1_CAN_B4.2 U1_CAN_B4.10 | length 25.2
  Top Layer w0.254: v1(86,64) 87.925,64 89.975,66.05 R1_CAN_B4.2@90,66.05 ; U1_CAN_B4.10@86.8,53.225 86.8,51.911 87.5,51.211 v1(87.5,50.5)
  Bottom Layer w0.254: v1(86,64) 85.934,63.934 85.934,63.434 83.096,60.596 83.096,53.588 86.261,50.423 86.795,50.423 86.819,50.447 87.447,50.447 v1(87.5,50.5)
NetR2_CAN_A1_2: R2_CAN_A1.2 U1_CAN_A1.11 | length 19.7
  Top Layer w0.254: v1(6.5,51.5) 6.5,51.594 6.8,51.894 U1_CAN_A1.11@6.8,53.225 ; v1(7.5,65) 7.5,65.5 8.115,66.115 8.565,66.115 R2_CAN_A1.2@8.6,66.15
  Bottom Layer w0.254: v1(6.5,51.5) 4,54 4,60.429 7.5,63.929 v1(7.5,65)
NetR2_CAN_A2_2: R2_CAN_A2.2 U1_CAN_A2.11 | length 20.6
  Top Layer w0.254: U1_CAN_A2.11@33.3,53.225 33.3,51.294 33.5,51.094 v1(33.5,51) ; v1(34.5,65) 34.566,65.066 34.566,65.641 35.075,66.15 R2_CAN_A2.2@35.1,66.15
  Bottom Layer w0.254: v1(33.5,51) 30.5,54 30.5,60.429 34.5,64.429 v1(34.5,65)
NetR2_CAN_B3_2: R2_CAN_B3.2 U1_CAN_B3.11 | length 20.6
  Top Layer w0.254: U1_CAN_B3.11@59.8,53.225 59.8,51.294 60,51.094 v1(60,51) ; v1(61,65) 61.066,65.066 61.066,65.641 61.575,66.15 R2_CAN_B3.2@61.6,66.15
  Bottom Layer w0.254: v1(60,51) 57,54 57,60.429 61,64.429 v1(61,65)
NetR2_CAN_B4_2: R2_CAN_B4.2 U1_CAN_B4.11 | length 20.6
  Top Layer w0.254: U1_CAN_B4.11@86.3,53.225 86.3,51.294 86.5,51.094 v1(86.5,51) ; v1(87.5,65) 87.566,65.066 87.566,65.641 88.075,66.15 R2_CAN_B4.2@88.1,66.15
  Bottom Layer w0.254: v1(86.5,51) 83.5,54 83.5,60.429 87.5,64.429 v1(87.5,65)
NetR4_CAN_A1_1: R4_CAN_A1.1 U1_CAN_A1.27 | length 2.8
  Top Layer w0.15: U1_CAN_A1.27@7.3,44.575 7.3,43.2 7.55,42.95 R4_CAN_A1.1@7.55,41.9
NetR4_CAN_A2_1: R4_CAN_A2.1 U1_CAN_A2.27 | length 2.8
  Top Layer w0.15: U1_CAN_A2.27@33.8,44.575 33.8,43.2 34.05,42.95 R4_CAN_A2.1@34.05,41.9
NetR4_CAN_B3_1: R4_CAN_B3.1 U1_CAN_B3.27 | length 2.8
  Top Layer w0.15: U1_CAN_B3.27@60.3,44.575 60.3,43.2 60.55,42.95 R4_CAN_B3.1@60.55,41.9
NetR4_CAN_B4_1: R4_CAN_B4.1 U1_CAN_B4.27 | length 2.8
  Top Layer w0.15: U1_CAN_B4.27@86.8,44.575 86.8,43.2 87.05,42.95 R4_CAN_B4.1@87.05,41.9
NetR5_CAN_A1_2: R5_CAN_A1.2 U2_CAN_A1.8 | length 2.8
  Top Layer w0.254: U2_CAN_A1.8@22.864,49.905 23.746,49.905 24.091,50.25 R5_CAN_A1.2@25.5,50.25
NetR5_CAN_A2_2: R5_CAN_A2.2 U2_CAN_A2.8 | length 2.8
  Top Layer w0.254: U2_CAN_A2.8@49.364,49.905 50.246,49.905 50.591,50.25 R5_CAN_A2.2@52,50.25
NetR5_CAN_B3_2: R5_CAN_B3.2 U2_CAN_B3.8 | length 2.8
  Top Layer w0.254: U2_CAN_B3.8@75.864,49.905 76.746,49.905 77.091,50.25 R5_CAN_B3.2@78.5,50.25
NetR5_CAN_B4_2: R5_CAN_B4.2 U2_CAN_B4.8 | length 2.8
  Top Layer w0.254: U2_CAN_B4.8@102.364,49.905 103.246,49.905 103.591,50.25 R5_CAN_B4.2@105,50.25
NetR9_1: R9.1 U6.5 U7.3 | length 5
  Top Layer w0.254: U6.5@89,18.5 89,19.5 89.8,20.3 R9.1@90.45,20.3 90.45,21.016 89.65,21.816 U7.3@89.65,22.23
NetR14_1: R14.1 TP2.1 U7.5 | length 7.5
  Top Layer w0.254: R14.1@85,23.95 85.05,24 85.5,24 86.5,25 88.6,25 89,24.6 U7.5@89,23.77
  Top Layer w0.3: R14.1@85,23.95 TP2.1@85,26
NetU3_1: U3.1 U4.10 | length 66.7
  Top Layer w0.25: U4.10@47.62,17.036 47.424,17.036 47.277,16.889 47.277,16.47 46.897,16.089 44.91,16.089 44.1,16.899 44.1,19.166 46.259,21.325 60.73,21.325 60.905,21.5 v1(61,21.5) ; v1(66,21.5) 66.095,21.5 66.27,21.325 66.825,21.325 73.4,27.9 89.766,27.9 91,26.666 91,24.166 93.466,21.7 94.375,21.7 94.729,21.7 95.479,22.45 U3.1@95.8,22.45
  Bottom Layer w0.25: v1(61,21.5) 61.095,21.5 61.27,21.325 65.73,21.325 65.905,21.5 v1(66,21.5)
NetU3_3: U3.3 U4.9 | length 65.5
  Top Layer w0.25: U4.9@46.555,17.927 46.555,17.241 46.877,16.918 46.877,16.636 46.731,16.489 45.076,16.489 44.5,17.065 44.5,19 46.425,20.925 60.73,20.925 60.905,20.75 v1(61,20.75) ; v1(66,20.75) 66.095,20.75 66.27,20.925 66.991,20.925 73.566,27.5 89.6,27.5 90.6,26.5 90.6,24 93.3,21.3 94.209,21.3 94.729,21.3 95.479,20.55 U3.3@95.8,20.55
  Bottom Layer w0.25: v1(61,20.75) 61.095,20.75 61.27,20.925 65.73,20.925 65.905,20.75 v1(66,20.75)
NetU4_15: U4.15 Y2.3 | length 7
  Top Layer w0.254: U4.15@54.175,17.927 54.175,17.241 55.193,16.223 58.277,16.223 58.977,15.523 58.977,15.248 Y2.3@59.375,14.85
NetU4_16: U4.16 Y2.1 | length 2.8
  Top Layer w0.254: U4.16@55.445,17.927 55.445,17.353 55.648,17.15 Y2.1@57.625,17.15
NRST_CAN_A1: C4_CAN_A1.1 P1_CAN_A1.4 S2_CAN_A1.1 S2_CAN_A1.4 U1_CAN_A1.7 | length 49
  Top Layer w0.254: S2_CAN_A1.4@3.5,60.6 3.531,60.631 7.569,60.631 S2_CAN_A1.1@7.6,60.6 ; U1_CAN_A1.7@8.8,53.225 8.8,54.7 8.348,55.152 7.598,55.152 C4_CAN_A1.1@7.25,55.5 6.902,55.848 6.902,56.571 6.894,56.579 6.894,58.394 7.6,59.1 S2_CAN_A1.1@7.6,60.6 ; v1(11,60.5) 10.906,60.5 10.829,60.577 7.623,60.577 S2_CAN_A1.1@7.6,60.6
  Bottom Layer w0.254: v1(11,60.5) 16,60.5 16.5,60 16.5,46 17.5,45 18.5,45 19.5,44 19.5,40.04 P1_CAN_A1.4@23.04,36.5
NRST_CAN_A2: C4_CAN_A2.1 P1_CAN_A2.4 S2_CAN_A2.1 S2_CAN_A2.4 U1_CAN_A2.7 | length 49.2
  Top Layer w0.254: S2_CAN_A2.4@30,60.6 30.031,60.631 34.069,60.631 S2_CAN_A2.1@34.1,60.6 ; U1_CAN_A2.7@35.3,53.225 35.3,54.7 34.848,55.152 34.098,55.152 C4_CAN_A2.1@33.75,55.5 33.402,55.848 33.402,56.571 33.394,56.579 33.394,58.394 34.1,59.1 S2_CAN_A2.1@34.1,60.6 ; v1(36.5,60.75) 36.406,60.75 36.256,60.6 S2_CAN_A2.1@34.1,60.6
  Bottom Layer w0.254: v1(36.5,60.75) 42.25,60.75 43,60 43,45.75 43.75,45 45,45 46,44 46,40.04 P1_CAN_A2.4@49.54,36.5
NRST_CAN_B3: C4_CAN_B3.1 P1_CAN_B3.4 S2_CAN_B3.1 S2_CAN_B3.4 U1_CAN_B3.7 | length 48.8
  Top Layer w0.254: S2_CAN_B3.4@56.5,60.6 56.531,60.631 60.569,60.631 S2_CAN_B3.1@60.6,60.6 ; U1_CAN_B3.7@61.8,53.225 61.8,54.7 61.348,55.152 60.598,55.152 C4_CAN_B3.1@60.25,55.5 59.902,55.848 59.902,56.571 59.894,56.579 59.894,58.394 60.6,59.1 S2_CAN_B3.1@60.6,60.6 ; v1(63.25,60.5) 63.156,60.5 63.079,60.577 60.623,60.577 S2_CAN_B3.1@60.6,60.6
  Bottom Layer w0.254: v1(63.25,60.5) 68.75,60.5 69.577,59.673 69.577,45.923 70.5,45 71.5,45 72.5,44 72.5,40.04 P1_CAN_B3.4@76.04,36.5
NRST_CAN_B4: C4_CAN_B4.1 P1_CAN_B4.4 S2_CAN_B4.1 S2_CAN_B4.4 U1_CAN_B4.7 | length 49.1
  Top Layer w0.254: S2_CAN_B4.4@83,60.6 83.031,60.631 87.069,60.631 S2_CAN_B4.1@87.1,60.6 ; U1_CAN_B4.7@88.3,53.225 88.3,54.7 87.848,55.152 87.098,55.152 C4_CAN_B4.1@86.75,55.5 86.402,55.848 86.402,56.571 86.394,56.579 86.394,58.394 87.1,59.1 S2_CAN_B4.1@87.1,60.6 ; v1(89.75,60.75) 89.656,60.75 89.506,60.6 S2_CAN_B4.1@87.1,60.6
  Bottom Layer w0.254: v1(89.75,60.75) 95.327,60.75 96.077,60 96.077,45.923 97,45 98,45 99,44 99,40.04 P1_CAN_B4.4@102.54,36.5
SPI0_MISO: P2.21 R4_CAN_A1.2 R4_CAN_A2.2 | length 79.1
  Top Layer w0.254: R4_CAN_A1.2@7.55,40.4 7.55,36.521 35.76,8.311 P2.21@35.76,7.04 ; R4_CAN_A2.2@34.05,40.4 34.05,27.45 34.5,27 v1(34.5,15.5)
  Bottom Layer w0.254: v1(34.5,15.5) 34.5,8.3 P2.21@35.76,7.04
SPI0_MOSI: P2.19 U1_CAN_A1.28 U1_CAN_A2.28 | length 89.8
  Top Layer w0.254: U1_CAN_A1.28@7.8,44.575 7.8,43.2 9,42 9,37 38.042,7.958 38.042,7.298 P2.19@38.3,7.04 ; U1_CAN_A2.28@34.3,44.575 34.3,43.2 35,42.5 35,32 34.5,31.5 34.5,28 35.5,27 35.5,11.5 v1(38.3,8.7)
  Bottom Layer w0.254: P2.19@38.3,7.04 v1(38.3,8.7)
SPI0_SCK: R18.1 U1_CAN_A1.26 U1_CAN_A2.26 | length 77.8
  Top Layer w0.254: U1_CAN_A1.26@6.8,44.575 6.8,42.442 6.5,42.142 6.5,35.5 27.25,14.75 27.25,14.25 28.527,12.973 28.913,12.973 R18.1@28.97,13.03 29.04,13.101 29.04,13.487 28.97,13.558 28.97,14.03 v1(28.25,14.75) ; v1(33,16) 33,27 33.5,27.5 33.5,31.5 33,32 33,42.142 33.3,42.442 U1_CAN_A2.26@33.3,44.575
  Bottom Layer w0.254: v1(28.25,14.75) 29.5,16 v1(33,16)
SPI1_MISO: P2.22 R4_CAN_B3.2 R4_CAN_B4.2 | length 140.1
  Top Layer w0.254: P2.22@35.76,4.5 37.26,3 62,3 64,5 64,23 68.5,27.5 68.5,30 70,31.5 83.05,31.5 87.05,35.5 R4_CAN_B4.2@87.05,40.4 ; v1(39,16) 39,27.5 38.5,28 38.5,30.5 41.5,33.5 44,33.5 44.5,33 59.5,33 60.55,34.05 R4_CAN_B3.2@60.55,40.4
  Bottom Layer w0.254: P2.22@35.76,4.5 37,5.74 37,9.5 38,10.5 38,15 v1(39,16)
SPI1_MOSI: P2.37 U1_CAN_B3.28 U1_CAN_B4.28 | length 191.3
  Top Layer w0.254: v1(24.5,11) 19.4,11 P2.37@15.44,7.04 15.44,6.676 15.781,6.335 15.781,6.219 16.616,5.384 16.616,3.884 18.25,2.25 63.25,2.25 65,4 65,23 69,27 69,29.656 69.844,30.5 83.5,30.5 88.5,35.5 88.5,42 87.3,43.2 U1_CAN_B4.28@87.3,44.575 ; v1(40,17) 40,27.5 39,28.5 39,30 42,33 43.5,33 44.5,32 60,32 61.464,33.464 61.464,42.536 60.8,43.2 U1_CAN_B3.28@60.8,44.575
  Bottom Layer w0.254: v1(24.5,11) 24.5,12.5 29,17 v1(40,17)
SPI1_SCK: R17.1 U1_CAN_B3.26 U1_CAN_B4.26 | length 124.4
  Top Layer w0.254: U1_CAN_B3.26@59.8,44.575 59.8,42.442 59.5,42.142 59.5,35 58.5,34 41,34 38,31 38,15 39.75,13.25 R17.1@44,13.25 44.1,13.25 45.433,11.917 58.417,11.917 59.5,13 v1(61,13) ; v1(63,13) 63,23 68,28 68,30.5 70,32.5 83,32.5 86,35.5 86,42.142 86.3,42.442 U1_CAN_B4.26@86.3,44.575
  Bottom Layer w0.254: v1(61,13) v1(63,13)
SPI_INT1: P2.29 U1_CAN_A1.22 | length 53.3
  Top Layer w0.254: U1_CAN_A1.22@4.725,47.15 4.734,47.141 5.513,47.141 5.827,46.827 5.827,44.327 4.5,43 3.5,43 3,42.5 3,35 27,11 27,8.44 P2.29@25.6,7.04
SPI_INT2: P2.31 U1_CAN_A2.22 | length 45.4
  Top Layer w0.254: v1(29.5,30.5) 29.5,42.5 30,43 31,43 32.327,44.327 32.327,46.827 32.013,47.141 31.234,47.141 U1_CAN_A2.22@31.225,47.15
  Bottom Layer w0.254: P2.31@23.06,7.04 23.06,12.56 29.5,19 v1(29.5,30.5)
SPI_INT3: P2.32 U1_CAN_B3.22 | length 74.6
  Top Layer w0.254: v1(26.5,21) 28.5,23 v1(30.5,23) ; v1(56,36.5) 56,42.5 56.5,43 57.5,43 58.827,44.327 58.827,46.827 58.513,47.141 57.734,47.141 U1_CAN_B3.22@57.725,47.15
  Bottom Layer w0.254: P2.32@23.06,4.5 23.06,4.864 22.699,5.225 22.699,5.301 22.093,5.907 22.023,5.977 22.019,6.076 21.984,6.999 ; v1(26.5,21) 22,16.5 22,7.231 ; v1(30.5,23) 53.351,23 53.5,23.149 53.5,27.5 55.5,29.5 55.5,36 v1(56,36.5) ; 21.984,6.999 cw(c23.06,7.04) 22,7.231 ; 21.984,6.999 cw(c23.06,7.04) 22,7.231
SPI_INT4: P2.33 U1_CAN_B4.22 | length 94.6
  Top Layer w0.254: v1(28.5,21.5) v1(30.5,21.5) ; v1(66,31) 69.5,34.5 81.5,34.5 82.5,35.5 82.5,42.5 83,43 84,43 85.327,44.327 85.327,46.827 85.013,47.141 84.234,47.141 U1_CAN_B4.22@84.225,47.15
  Bottom Layer w0.254: P2.33@20.52,7.04 20.52,17.52 25,22 28,22 v1(28.5,21.5) ; v1(30.5,21.5) 54,21.5 63.5,31 v1(66,31)
SPI_NSS1: P2.24 R3_CAN_A1.1 U1_CAN_A1.25 | length 52.1
  Top Layer w0.15: R3_CAN_A1.1@5.55,41.9 5.55,42 6.3,42.75 U1_CAN_A1.25@6.3,44.575
  Top Layer w0.254: R3_CAN_A1.1@5.55,41.9 5.55,40.766 5.577,40.739 5.577,34.423 v1(31.757,8.243) ; P2.24@33.056,4.664 P2.24@33.22,4.5
  Bottom Layer w0.254: v1(31.757,8.243) 31.757,6.98 33.056,5.681 33.056,4.664 P2.24@33.22,4.5
SPI_NSS2: P2.26 R3_CAN_A2.1 U1_CAN_A2.25 | length 43
  Top Layer w0.15: R3_CAN_A2.1@32.05,41.9 32.05,42 32.8,42.75 U1_CAN_A2.25@32.8,44.575
  Top Layer w0.254: v1(32,15) 32,27 33,28 33,31.077 32.077,32 32.077,40.739 32.05,40.766 R3_CAN_A2.1@32.05,41.9
  Bottom Layer w0.254: P2.26@30.68,4.5 30.516,4.664 30.516,5.681 29.217,6.98 29.217,9.217 32,12 v1(32,15)
SPI_NSS3: P2.18 R3_CAN_B3.1 U1_CAN_B3.25 | length 60.4
  Top Layer w0.15: R3_CAN_B3.1@58.55,41.9 58.55,42 59.3,42.75 U1_CAN_B3.25@59.3,44.575
  Top Layer w0.254: v1(39.5,9) 37,11.5 37,27.5 37.5,28 37.5,31.071 41.429,35 57.654,35 58.55,35.896 R3_CAN_B3.1@58.55,41.9
  Bottom Layer w0.254: v1(39.5,9) 39.5,5.84 P2.18@40.84,4.5
SPI_NSS4: P2.16 R3_CAN_B4.1 U1_CAN_B4.25 | length 72.9
  Top Layer w0.15: R3_CAN_B4.1@85.05,41.9 85.05,42 85.8,42.75 U1_CAN_B4.25@85.8,44.575
  Top Layer w0.254: v1(45.5,9.5) 46.5,10.5 60,10.5 62,12.5 62,23 67.5,28.5 67.5,31 70,33.5 82.5,33.5 85.077,36.077 85.077,40.739 85.05,40.766 R3_CAN_B4.1@85.05,41.9
  Bottom Layer w0.254: P2.16@43.38,4.5 44.5,5.62 44.5,8.5 v1(45.5,9.5)
SWCLK_CAN_A1: P1_CAN_A1.3 U1_CAN_A1.37 | length 15
  Top Layer w0.254: U1_CAN_A1.37@13.375,46.15 13.479,46.15 13.5,46.129 v1(13.5,44.5)
  Bottom Layer w0.254: v1(13.5,44.5) 13.5,39.5 14.096,38.904 18.096,38.904 P1_CAN_A1.3@20.5,36.5
SWCLK_CAN_A2: P1_CAN_A2.3 U1_CAN_A2.37 | length 15
  Top Layer w0.254: U1_CAN_A2.37@39.875,46.15 39.979,46.15 40,46.129 v1(40,44.5)
  Bottom Layer w0.254: v1(40,44.5) 40,39.5 40.596,38.904 44.596,38.904 P1_CAN_A2.3@47,36.5
SWCLK_CAN_B3: P1_CAN_B3.3 U1_CAN_B3.37 | length 15
  Top Layer w0.254: U1_CAN_B3.37@66.375,46.15 66.479,46.15 66.5,46.129 v1(66.5,44.5)
  Bottom Layer w0.254: v1(66.5,44.5) 66.5,39.5 67.096,38.904 71.096,38.904 P1_CAN_B3.3@73.5,36.5
SWCLK_CAN_B4: P1_CAN_B4.3 U1_CAN_B4.37 | length 15
  Top Layer w0.254: U1_CAN_B4.37@92.875,46.15 92.979,46.15 93,46.129 v1(93,44.5)
  Bottom Layer w0.254: v1(93,44.5) 93,39.5 93.596,38.904 97.596,38.904 P1_CAN_B4.3@100,36.5
SWDIO_CAN_A1: P1_CAN_A1.2 U1_CAN_A1.34 | length 13.4
  Top Layer w0.254: U1_CAN_A1.34@10.8,44.575 10.8,43.117 10.618,42.935 10.618,40.066 11.684,39 v1(12.5,39)
  Bottom Layer w0.254: v1(12.5,39) 13,38.5 15.96,38.5 P1_CAN_A1.2@17.96,36.5
SWDIO_CAN_A2: P1_CAN_A2.2 U1_CAN_A2.34 | length 13.4
  Top Layer w0.254: U1_CAN_A2.34@37.3,44.575 37.3,43.117 37.118,42.935 37.118,40.066 38.184,39 v1(39,39)
  Bottom Layer w0.254: v1(39,39) 39.5,38.5 42.46,38.5 P1_CAN_A2.2@44.46,36.5
SWDIO_CAN_B3: P1_CAN_B3.2 U1_CAN_B3.34 | length 13.4
  Top Layer w0.254: U1_CAN_B3.34@63.8,44.575 63.8,43.117 63.618,42.935 63.618,40.066 64.684,39 v1(65.5,39)
  Bottom Layer w0.254: v1(65.5,39) 66,38.5 68.96,38.5 P1_CAN_B3.2@70.96,36.5
SWDIO_CAN_B4: P1_CAN_B4.2 U1_CAN_B4.34 | length 13.4
  Top Layer w0.254: U1_CAN_B4.34@90.3,44.575 90.3,43.117 90.118,42.935 90.118,40.066 91.184,39 v1(92,39)
  Bottom Layer w0.254: v1(92,39) 92.5,38.5 95.46,38.5 P1_CAN_B4.2@97.46,36.5
UART1_CTS: P2.36 P3.12 | length 69.9
  Top Layer w0.254: P2.36@17.98,4.5 17.98,4.27 P2.36@18.21,4.27 ; P3.12@82.42,4.46 82.46,4.42 82.46,1.04 v1(82.5,1)
  Bottom Layer w0.254: P2.36@17.98,4.5 21.48,1 v1(82.5,1)
UART1_RTS: P2.11 P3.11 | length 37.6
  Top Layer w0.254: P2.11@48.46,7.04 48.718,7.298 48.718,8.218 50.077,9.577 62.484,9.577 v1(62.53,9.53) ; v1(66,9.5) 72,9.5 73.127,10.627 78.793,10.627 P3.11@82.42,7
  Bottom Layer w0.254: v1(62.53,9.53) 62.545,9.515 65.985,9.515 v1(66,9.5)
UART1_RXD: P2.10 P3.10 | length 36.2
  Top Layer w0.254: v1(65.5,3.5) 66,3 v1(68.5,3)
  Bottom Layer w0.254: P2.10@51,4.5 52.25,3.25 65.178,3.25 65.428,3.5 v1(65.5,3.5) ; v1(68.5,3) 70.5,3 71.5,2 82.5,2 P3.10@84.96,4.46
UART1_TXD: P2.8 P3.9 | length 35.7
  Top Layer w0.2: v1(66.75,5.25) 68,4 v1(68.5,4)
  Bottom Layer w0.2: P2.8@53.54,4.5 54.59,5.55 62.45,5.55 62.75,5.25 v1(66.75,5.25) ; v1(68.5,4) 70.554,4 71.804,2.75 80.5,2.75 80.972,3.222 80.972,4.497 82.289,5.814 84.064,5.814 84.96,6.71 P3.9@84.96,7
USB_DM1: U1_CAN_A1.32 U4.7 | length 53.7
  Top Layer w0.254: U1_CAN_A1.32@9.8,44.575 9.8,43.888 9.848,43.84 9.848,43.307 9.5,42.959 9.5,38.429 13.714,34.214 18.833,29.096 31.901,29.096 32.074,28.923 v1(32.167,28.923) ; v1(41,29.7) 41.8,29.7 41.948,29.552 46.448,29.552 47.392,28.608 47.392,25.111 47.541,24.962 47.622,24.962 47.825,24.759 U4.7@47.825,24.073
  Bottom Layer w0.254: v1(32.167,28.923) 32.261,28.923 32.434,29.096 40.396,29.096 v1(41,29.7)
USB_DM2: U1_CAN_A2.32 U4.5 | length 29.4
  Top Layer w0.254: U1_CAN_A2.32@36.3,44.575 36.3,43.888 36.348,43.84 36.348,43.307 36,42.959 36,37.929 39.276,34.653 39.276,34.408 v1(39.342,34.342) ; v1(43.205,31.795) 43.548,31.452 43.548,31.238 44.252,30.534 47.534,30.534 47.54,30.54 49.932,28.149 49.932,25.111 50.081,24.962 50.162,24.962 50.365,24.759 U4.5@50.365,24.073
  Bottom Layer w0.254: v1(39.342,34.342) 39.408,34.276 39.653,34.276 42.133,31.795 v1(43.205,31.795)
USB_DM3: U1_CAN_B3.32 U4.3 | length 30.5
  Top Layer w0.254: U4.3@52.905,24.073 52.905,24.759 52.702,24.962 52.621,24.962 52.472,25.111 52.472,27.239 52.134,27.577 52.132,27.577 51.923,27.786 51.923,29.994 52.929,31 61.5,31 62.5,32 62.5,42.959 62.848,43.307 62.848,43.84 62.8,43.888 U1_CAN_B3.32@62.8,44.575
USB_DM4: U1_CAN_B4.32 U4.1 | length 53.4
  Top Layer w0.254: U4.1@55.445,24.073 55.445,24.759 55.242,24.962 55.161,24.962 55.012,25.111 55.012,27.239 56.921,29.148 64.486,29.148 64.634,29 65.83,29 v1(66.503,29.673) ; v1(69.833,29.673) 69.926,29.673 70.099,29.5 88,29.5 89,30.5 89,42.959 89.348,43.307 89.348,43.84 89.3,43.888 U1_CAN_B4.32@89.3,44.575
  Bottom Layer w0.254: v1(66.503,29.673) 66.594,29.673 66.767,29.5 69.566,29.5 69.739,29.673 v1(69.833,29.673)
USB_DP1: U1_CAN_A1.33 U4.8 | length 52.4
  Top Layer w0.254: U1_CAN_A1.33@10.3,44.575 10.3,43.888 10.252,43.84 10.252,43.14 9.904,42.792 9.904,38.596 19,29.5 31.901,29.5 32.074,29.673 v1(32.167,29.673) ; v1(40,29.673) 40.673,29 41.8,29 41.948,29.148 46.281,29.148 46.988,28.441 46.988,25.111 46.839,24.962 46.758,24.962 46.555,24.759 U4.8@46.555,24.073
  Bottom Layer w0.254: v1(32.167,29.673) 32.261,29.673 32.434,29.5 39.5,29.5 39.607,29.607 39.934,29.607 v1(40,29.673)
USB_DP2: U1_CAN_A2.33 U4.6 | length 28.7
  Top Layer w0.254: U1_CAN_A2.33@36.8,44.575 36.8,43.888 36.752,43.84 36.752,43.14 36.404,42.792 36.404,38.096 39.561,34.939 39.806,34.939 v1(39.872,34.872) ; v1(42.372,32.372) 42.372,31.628 43,31 43.214,31 44.085,30.13 47.38,30.13 49.528,27.982 49.528,25.111 49.379,24.962 49.298,24.962 49.095,24.759 U4.6@49.095,24.073
  Bottom Layer w0.254: v1(39.872,34.872) 39.939,34.806 39.939,34.561 42.061,32.439 42.306,32.439 v1(42.372,32.372)
USB_DP3: U1_CAN_B3.33 U4.4 | length 30.6
  Top Layer w0.254: U4.4@51.635,24.073 51.635,24.759 51.838,24.962 51.919,24.962 52.068,25.111 52.068,26.733 51.895,26.906 v1(51.895,27) ; v1(52.512,28.013) 52.5,28.025 52.5,30 53.096,30.596 61.667,30.596 62.904,31.833 62.904,42.792 63.252,43.14 63.252,43.84 63.3,43.888 U1_CAN_B3.33@63.3,44.575
  Bottom Layer w0.254: v1(51.895,27) 52.445,27.55 52.445,27.947 v1(52.512,28.013)
USB_DP4: U1_CAN_B4.33 U4.2 | length 54.6
  Top Layer w0.254: U4.2@54.175,24.073 54.175,24.759 54.378,24.962 54.459,24.962 54.608,25.111 54.608,27.406 56.754,29.552 64.552,29.552 64.634,29.634 64.934,29.634 v1(65,29.7) ; v1(69.833,28.923) 69.926,28.923 70.099,29.096 88.167,29.096 89.404,30.333 89.404,42.792 89.752,43.14 89.752,43.84 89.8,43.888 U1_CAN_B4.33@89.8,44.575
  Bottom Layer w0.254: v1(65,29.7) 65.1,29.6 65.757,29.6 66.261,29.096 69.566,29.096 69.739,28.923 v1(69.833,28.923)
pads on no net: J2. J2.A8 J2.B8 U1_CAN_A1.2 U1_CAN_A1.3 U1_CAN_A1.4 U1_CAN_A1.12 U1_CAN_A1.13 U1_CAN_A1.14 U1_CAN_A1.15 U1_CAN_A1.16 U1_CAN_A1.17 U1_CAN_A1.18 U1_CAN_A1.19 U1_CAN_A1.20 U1_CAN_A1.21 U1_CAN_A1.29 U1_CAN_A1.30 U1_CAN_A1.31 U1_CAN_A1.38 U1_CAN_A1.39 U1_CAN_A1.40 U1_CAN_A1.41 U1_CAN_A1.42 U1_CAN_A1.43 U1_CAN_A2.2 U1_CAN_A2.3 U1_CAN_A2.4 U1_CAN_A2.12 U1_CAN_A2.13 U1_CAN_A2.14 U1_CAN_A2.15 U1_CAN_A2.16 U1_CAN_A2.17 U1_CAN_A2.18 U1_CAN_A2.19 U1_CAN_A2.20 U1_CAN_A2.21 U1_CAN_A2.29 U1_CAN_A2.30 U1_CAN_A2.31 U1_CAN_A2.38 U1_CAN_A2.39 U1_CAN_A2.40 U1_CAN_A2.41 U1_CAN_A2.42 U1_CAN_A2.43 U1_CAN_B3.2 U1_CAN_B3.3 U1_CAN_B3.4 U1_CAN_B3.12 U1_CAN_B3.13 U1_CAN_B3.14 U1_CAN_B3.15 U1_CAN_B3.16 U1_CAN_B3.17 U1_CAN_B3.18 U1_CAN_B3.19 U1_CAN_B3.20 U1_CAN_B3.21 U1_CAN_B3.29 U1_CAN_B3.30 U1_CAN_B3.31 U1_CAN_B3.38 U1_CAN_B3.39 U1_CAN_B3.40 U1_CAN_B3.41 U1_CAN_B3.42 U1_CAN_B3.43 U1_CAN_B4.2 U1_CAN_B4.3 U1_CAN_B4.4 U1_CAN_B4.12 U1_CAN_B4.13 U1_CAN_B4.14 U1_CAN_B4.15 U1_CAN_B4.16 U1_CAN_B4.17 U1_CAN_B4.18 U1_CAN_B4.19 U1_CAN_B4.20 U1_CAN_B4.21 U1_CAN_B4.29 U1_CAN_B4.30 U1_CAN_B4.31 U1_CAN_B4.38 U1_CAN_B4.39 U1_CAN_B4.40 U1_CAN_B4.41 U1_CAN_B4.42 U1_CAN_B4.43

## Polygon pours and split planes (outlines as drawn)
3V3 on PWR "3V3_L03_P020" (solid, remove dead copper, pour order 20): 0,73 0,0 108,0 108,73
5V on PWR "5V_L03_P018" (solid, pour order 18): 78.5,23.5 78.5,21.6 82.8,21.6 83.9,20.5 83.9,17.9 88.6,17.9 88.6,19.2 86.8,19.2 86.2,19.8 86.2,22.1 87.1,23 88.6,23 88.6,24.5 86.6,24.5 85.6,23.5
5V_SPI on PWR "5V_SPI_L03_P017" (solid, pour order 17): 85.4,14 88.6,14 88.6,17.7 86.5,17.7 86.5,16.45 85.45,16.45 85.4,16.4
5V on Top Layer "5V_L01_P019" (solid, pour order 19): 86.6,24.5 88.6,24.5 88.6,23 87.1,23 86.2,22.1 86.2,19.8 86.8,19.2 88.6,19.2 88.6,17.9 83.9,17.9 83.9,20.4 82.7,21.6 81,21.6 81,23.5 85.6,23.5
5V_SPI on Top Layer "5V_SPI_L01_P014" (solid, pour order 14): 86.5,16.4 85.4,16.4 85.4,13.5 88.6,13.5 88.6,17.65 86.5,17.65
3V3 on Top Layer "3V3_L01_P015" (solid, remove dead copper, pour order 15): 82.6,21 82.6,19 78.5,19 77.5,18 74.5,18 74.5,18.5 74,19 70,19 70,22 77.5,22 78.5,21
GND on GND "GND_L02_P016" (solid, remove dead copper, pour order 16): 0,73 0,0 108,0 108,73
GND on Bottom Layer "GND_L04_P021" (solid, remove dead copper, pour order 21): 0,73 0,0 108,0 108,73

## Silkscreen, mask and mechanical layers (free items; w line width, h text height)
Top Overlay:
  drawing of 10 lines, arcs and shapes, not listed
  text "H   L   G" at 13.75,63.268 h1.52
  text "H   L   G" at 40.25,63.268 h1.52
  text "H   L   G" at 66.75,63.268 h1.52
  text "H   L   G" at 93.25,63.268 h1.52
  text "RESET" at 8.7,61.224 h2
  text "RESET" at 35.2,61.224 h2
  text "RESET" at 61.7,61.224 h2
  text "RESET" at 88.2,61.224 h2
  text "BOOT" at 19.7,39.724 h2
  text "BOOT" at 46.2,39.724 h2
  text "BOOT" at 72.7,39.724 h2
  text "BOOT" at 99.2,39.724 h2
  text "3V3" at 42.286,33 h1.2 r90
  text "GND" at 52.488,32.8 h1 r90
  text "3V3" at 68.686,32.8 h1.2 r90
  text "3V3" at 95.186,32.8 h1.2 r90
  text "3V3" at 15.586,32.7 h1.2 r90
  text "GND" at 78.988,32.7 h1 r90
  text "GND" at 105.488,32.7 h1 r90
  text "GND" at 25.888,32.6 h1 r90
  text "NRST" at 49.988,32.4 h1 r90
  text "NRST" at 76.488,32.3 h1 r90
  text "NRST" at 102.988,32.3 h1 r90
  text "NRST" at 23.388,32.2 h1 r90
  text "SWDIO" at 44.886,31.15 h1.2 r90
  text "SWDIO" at 71.386,31.05 h1.2 r90
  text "SWDIO" at 97.886,31.05 h1.2 r90
  text "SWDIO" at 18.286,30.95 h1.2 r90
  text "SWCLK" at 47.386,30.8 h1.2 r90
  text "SWCLK" at 73.886,30.7 h1.2 r90
  text "SWCLK" at 100.386,30.7 h1.2 r90
  text "SWCLK" at 20.786,30.6 h1.2 r90
  text "CAN A1" at 3.3,30.322 h2
  text "CAN A2" at 30.2,30.322 h2
  text "CAN B3" at 56.2,30.224 h2
  text "CAN B4" at 82.7,30.222 h2
  text "5VUSB" at 90.7,29.218 h1.5
  text "ST" at 83.7,27.218 h1.5
  text "3V3" at 67.2,19.218 h1.5
  text "BYTE SPIne" at 7.75,18.286 h3
  text "v1.0 · 10/2026" at 7.75,16.764 h1.2
  text "Johnan Luca - BARK Project" at 7.748,15.475 h1.2
  text "USB" at 104.5,15.018 h1.52
  text "5V_SPI" at 80.2,13.965 h1.5
  text "Jetson J12" at 11.8,11.518 h1.5
  text "1" at 60.8,11.2 h2
Bottom Overlay:
  drawing of 26 lines, arcs and shapes, not listed
  text "\"When times get tough, we BARK louder!\"" at 29.5,17.532 h1.52
  text "1  3V3 / 3  SDA1 / 5  SDA0 / 7  GND / 9  TX / 11 RTS / 13 GND / 15 PWM / 17 FS / 19 DOUT" at 76,12 h1 r270
  text "1" at 95.2,9.2 h1.5 r270
  text "2  GND / 4  SCL1 / 6  SCL0 / 8  GND / 10 RX / 12 CTS / 14 IO9 / 16 SCLK / 18 DIN / 20 GND" at 76,8 h1 r270
Mechanical 1:
  the board outline again, w0.254